# Altium PCB Zotino-DIOT.PCBDOC (part 11 of 11)
Units mil, origin at the board's own origin, x right, y up, seen from the top; angles counter-clockwise.
Board outline 8771.61 x 3949.04 mil, 4 copper layers (TopLayer, Internal Plane 2, Signal Layer 1, BottomLayer), stack 61.54 mil thick; 915 components, 534 nets, 3073 pads, 1180 vias.
Unrouted connection lines stored in the file: 36.
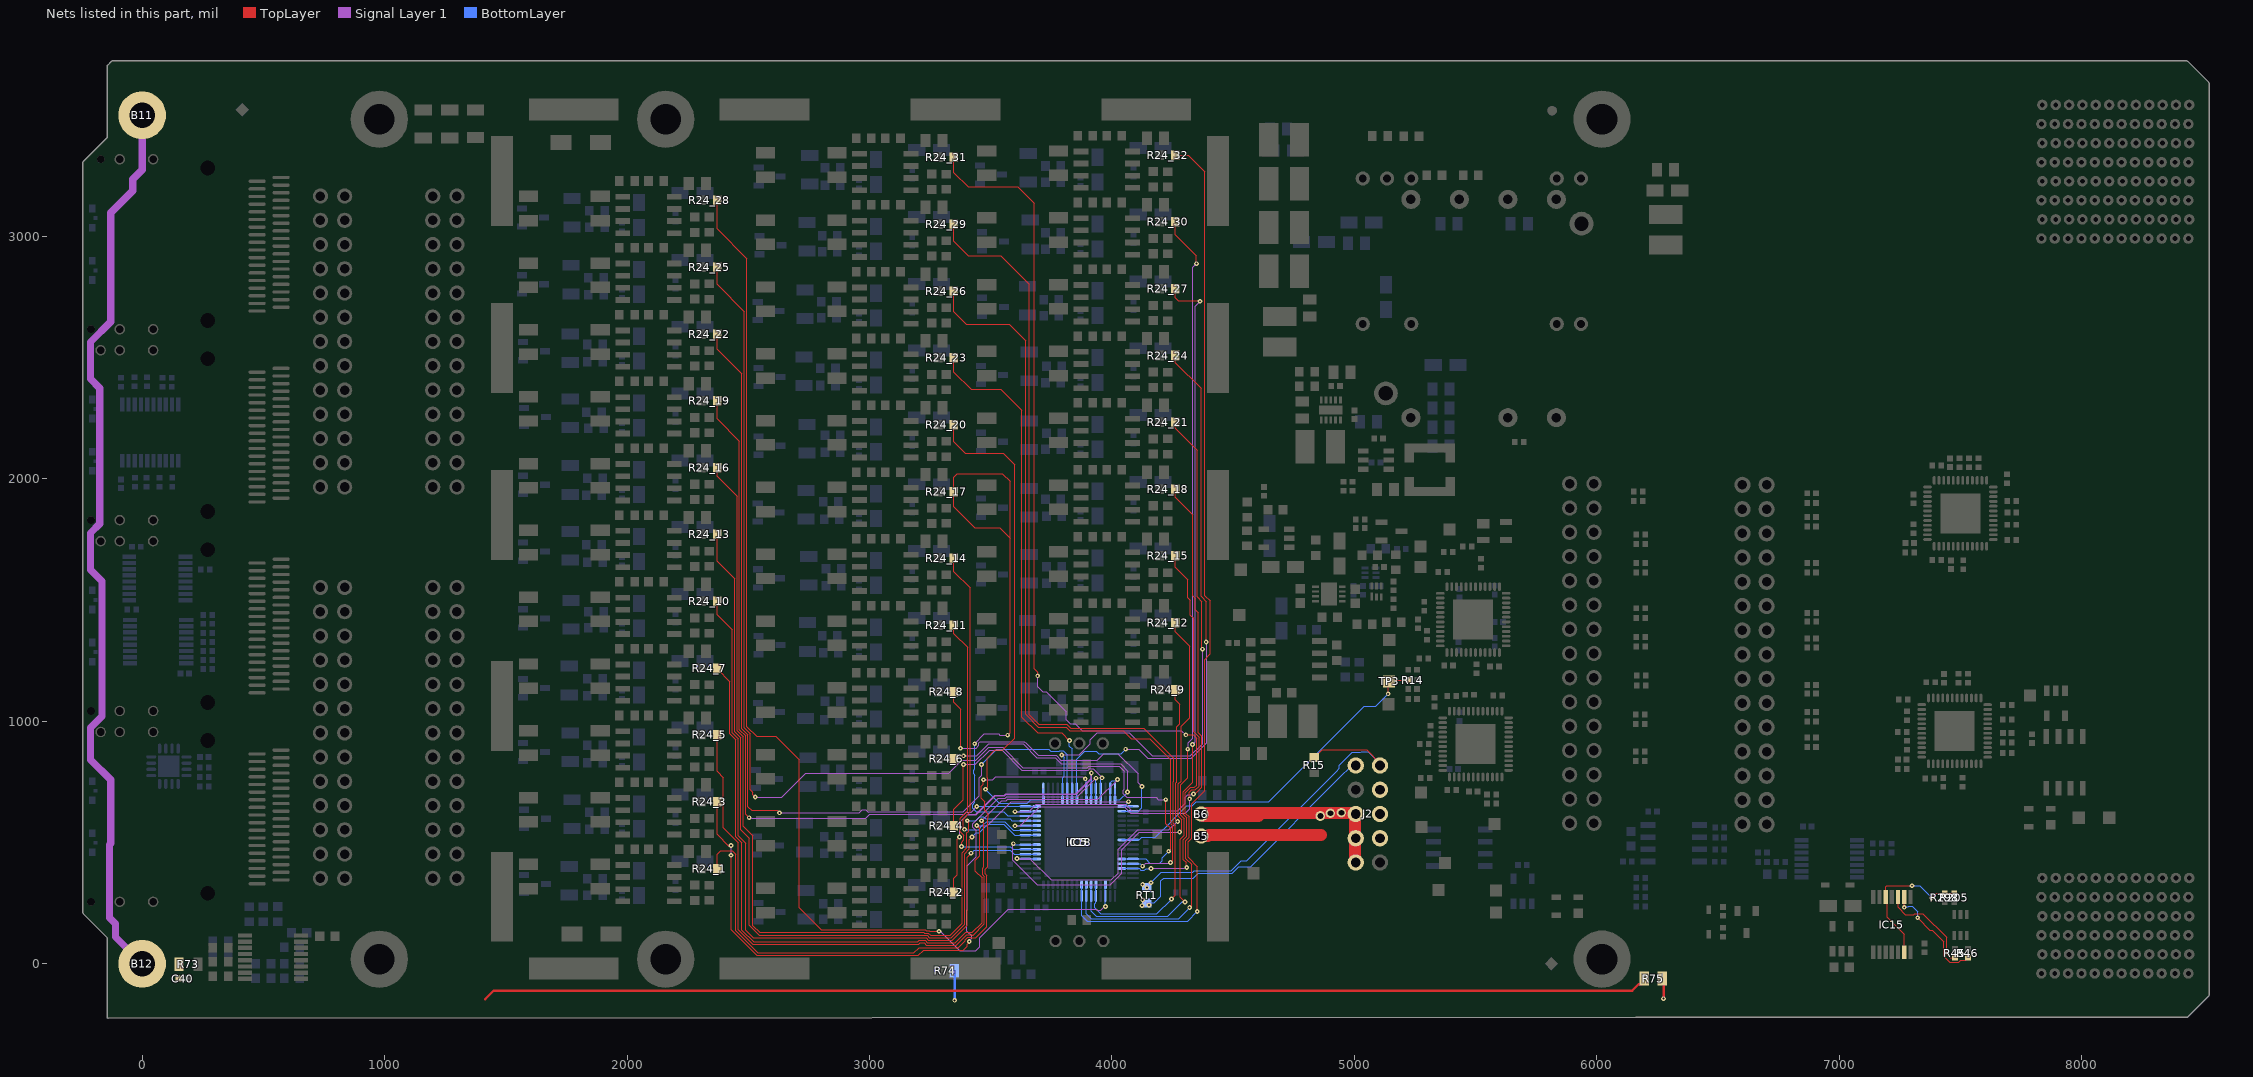
[diagram p12: the nets of this part, all layers, seen from the top]

## Via types
v1: diameter 19.68, hole 7.87, TopLayer to BottomLayer, tented both sides, 1050 vias
v2: diameter 23.62, hole 11.81, TopLayer to BottomLayer, tented both sides, 56 vias
v3: diameter 23.62, hole 11.81, TopLayer to BottomLayer, 28 vias
v4: diameter 39.37, hole 23.62, TopLayer to BottomLayer, tented both sides, 28 vias
v5: diameter 39.37, hole 19.68, TopLayer to BottomLayer, tented both sides, 7 vias
v6: diameter 19.68, hole 7.87, TopLayer to BottomLayer, tented bottom, 7 vias
v7: diameter 19.68, hole 7.87, TopLayer to BottomLayer, 4 vias

## Nets (pads, with @x,y where several pads share a name; then routed paths per layer and width w, separated by ;. In a path a pad name is that pad's centre, name@x,y a point inside that pad or via, vN(x,y) a via of type N, cw(c..) or ccw(c..) an arc to the next point about the centre after c; other vN are vias at no path point) (continued)
SDO: IC5.56 IC18.56 R14.1 TP3.1 | length 1483.5
  TopLayer w5: v1(5139.53,1113.71) 5139.53,1160.95 TP3.1@5143.46,1164.89 5148.46,1169.89 R14.1@5222.64,1169.89
  BottomLayer w5: 4113.65,511.35 4123.51,521.21 4179.67,521.21 4247.14,588.68 4247.14,590.03 4309.4,652.3 4332.37,652.3 4347.92,667.84 4646.42,667.84 5041.1,1062.53 5088.35,1062.53 v1(5139.53,1113.71)
  BottomLayer w6: IC18.56@4040.41,511.35 IC5.56@4086.67,511.35 4113.65,511.35
SENS1_1: J2.1 RT1.1 | length 1134
  BottomLayer w5: RT1.1@4144.07,251.04 4175.68,251.04 4202.36,277.72 4202.36,341.59 4214.64,353.87 4336.38,353.87 4356.28,373.77 4496.41,373.77 4523.75,401.11 4572.6,401.11 4938.74,767.25 4989.45,817.96 J2.1@5005.79,817.96
  other v1: 4123.78,239.69 4152.63,242.29 4126.9,263.7
SENS1_2: J2.2 R15.2 RT1.2 | length 1524
  TopLayer w5: R15.2@4833.97,851.04 4835.94,851.04 4868.29,883.39 5050.36,883.39 5105.79,827.96 J2.2@5105.79,817.96
  BottomLayer w5: v1(4160.83,334.18) 4204.14,377.49 4332.44,377.49 4338.72,383.77 4492.26,383.77 4533.23,424.73 4556.13,424.73 4926.52,795.13 4927.24,795.13 4938.74,806.62 4938.74,818.43 4992.31,872 5024.03,872 5027.55,875.52 5058.23,875.52 5105.79,827.96 J2.2@5105.79,817.96
  other v1: 4144.07,314.03 4126.9,326.76
SERVMOD_3V3: IC15.5 IC15.13 R205.1 R298.2 | length 616
  TopLayer w5: IC15.13@7268.3,47.36 7268.3,121.55 7197.88,191.96 7197.88,269.35 IC15.5@7191.53,275.71 7191.53,317.51 7196.85,322.83 7299.19,322.83 v1(7300.24,321.79) ; v1(7381.89,271.65) 7400.43,290.19 R205.1@7474.53,290.19
  BottomLayer w5: v1(7300.24,321.79) 7331.75,321.79 v1(7381.89,271.65)
STRIP1: B11.1 B12.1 C40.1 R73.1 R75.2 | length 8572.4
  TopLayer w10: 1415.35,-145.67 1449.8,-111.22 6145.67,-111.22 6172.32,-84.57 6181.18,-84.57 6195.87,-69.88 R75.2@6195.87,-61.02
  Signal Layer 1 w30: B12.1@0,0 -110.24,110.24 -110.24,165.35 -134.41,189.53 -134.41,491.57 -129.92,496.06 -129.92,758.74 -213.15,841.97 -213.15,973.48 -165.35,1021.28 -165.35,1577.64 -213.15,1625.43 -213.15,1777.4 -174.88,1815.67 -174.88,2374.57 -213.15,2412.83 -213.15,2564.81 -129.92,2648.04 -129.92,3098.43 -39.37,3188.98 -39.37,3236.22 0,3275.59 B11.1@0,3500
STRIP2: R74.1 | length 123.8
  TopLayer w10: v1@3350.39,-151.57 v1(3351.38,-150.59)
  BottomLayer w5: R74.1@3350.39,-28.54 R74.1@3351.38,-29.53
  BottomLayer w10: v1(3351.38,-150.59) 3351.38,-143.7 3351.38,-103.84 R74.1@3351.38,-29.53
STRIP3: R75.1 | length 82.7
  TopLayer w10: v1(6275.59,-143.7) R75.1@6275.59,-61.02
Switch_I2C.SCL: IC15.2 R46.2 | length 460.2
  TopLayer w5: v1(7268.3,232.86) IC15.2@7268.3,275.71 ; v1(7323.82,189.96) 7374.44,139.34 7383.29,139.34 7431.1,91.54 7431.1,30.51 7455.44,6.18 7492.73,6.18 7502.06,15.51 7521.55,15.51 R46.2@7530.47,24.42
  BottomLayer w5: v1(7268.3,232.86) 7271.11,235.67 7285.14,235.67 7286.7,237.23 7301.07,237.23 7323.82,214.49 v1(7323.82,189.96)
Switch_I2C.SDA: IC15.3 R45.2 | length 408.3
  TopLayer w5: IC15.3@7242.71,275.71 7242.71,233.27 7273.43,202.55 7306.77,202.55 7311.52,207.3 7344.86,207.3 7442.91,109.25 7442.91,39.37 7457.19,25.09 R45.2@7477.42,25.09
TEC1+: B5.1 J2.4 J2.6 J2.8 | length 496.9
  TopLayer w50: B5.1@4367.87,527.09 4395.43,527.09 4399.83,531.49 4490.68,531.49 4491.14,531.03 4862.75,531.03
TEC1-: B6.1 J2.5 J2.7 J2.9 | length 1067.7
  TopLayer w50: B6.1@4367.87,617.65 4375.75,609.77 4604.09,609.77 ; B6.1@4376.14,621.98 4997.2,621.98 5001.21,617.96 J2.5@5005.79,617.96 ; J2.5@4999.09,612.06 5002.55,608.6 5002.55,421.2 J2.9@5005.79,417.96
  other v4: 4860,609.77 4901.34,621.58 4946.61,622.57
VOUT1: IC5.42 IC18.42 R24_1.1 | length 2734.6
  TopLayer w5: R24_1.1@2371.5,393 2371.5,452.09 2386.21,466.8 2434.93,466.8 2448.84,452.89 2448.84,135.46 2538.65,45.66 3183.32,45.66 3204.5,66.83 3365.21,66.83 3394.23,95.85 3394.23,99.25 3404.39,109.41 3418.75,109.41 3420.3,107.86 3438.74,107.86 3484.23,153.35 3484.23,363.78 3476.69,371.32 3476.69,390.2 3487.85,401.36 3487.85,599.83 3490.61,602.59 3490.61,616.95 3475.01,632.55 3475.01,667.99 3460.77,682.23 3460.77,731.82 3470.23,741.28 v1(3470.23,759.38)
  Signal Layer 1 w5: v1(3470.23,759.38) 3508.01,759.38 3520.91,772.28 3880.74,772.28 v1(3889.99,763.03)
  BottomLayer w5: v1(3889.99,763.03) 3894.74,758.28 IC5.42@3894.74,722.96 IC18.42@3894.74,676.7
VOUT2: IC5.43 IC18.43 R24_2.1 | length 1051
  TopLayer w5: R24_2.1@3347.87,294.58 3347.87,353.66 3362.59,368.38 3362.59,476.35 3362.34,476.6 3362.34,513.68 v1(3371.81,523.16)
  Signal Layer 1 w5: v1(3371.81,523.16) 3371.81,583.12 3403.71,615.02 3404.61,615.02
  Signal Layer 1 w6: 3404.61,615.02 3439.14,615.02 3517.04,692.91 3556.33,692.91 3562.75,699.33 3851.52,699.33 3915.12,762.93 v1(3915.12,786.94)
  BottomLayer w6: IC18.43@3914.43,676.7 IC5.43@3914.43,722.96 3914.43,786.24 v1(3915.12,786.94)
VOUT3: IC5.44 IC18.44 R24_3.1 | length 2809.6
  TopLayer w5: R24_3.1@2371.5,668.59 2371.5,534.5 2418.11,487.89 v1(2428.84,487.89) ; v1(2428.84,447.89) 2428.84,141.32 2534.5,35.66 3202,35.66 3223.05,56.71 3387.45,56.71 3403.16,72.42 3403.16,79.69 3411.57,88.1 v1(3411.57,92.07)
  Signal Layer 1 w5: v1(2428.84,447.89) v1(2428.84,487.89) ; v1(3411.57,92.07) 3411.57,96.04 3421.26,105.73 3421.26,115.13 3401.56,134.83 3401.56,222.61 3402.62,223.67 3402.62,404.42 3440.33,442.13 3440.33,548.21 3425.33,563.22 3425.33,577.58 3530.16,682.41 3560.68,682.41 3567.1,688.83 3857.12,688.83 v1(3934.11,765.81)
  BottomLayer w5: IC18.44@3934.11,676.7 IC5.44@3934.11,722.96 v1(3934.11,765.81)
VOUT4: IC5.45 IC18.45 R24_4.1 | length 1009.4
  TopLayer w5: R24_4.1@3347.87,570.17 3347.87,637.01 3387.55,676.69 v1(3387.55,822.37)
  Signal Layer 1 w5: v1(3387.55,822.37) 3437.13,822.37 3496.18,881.42 3546.65,881.42 3629.11,798.96 3902.62,798.96 3907.93,804.28 3922.32,804.28 v1(3959.35,767.25)
  BottomLayer w5: IC18.45@3953.8,676.7 IC5.45@3953.8,722.96 3953.8,761.7 v1(3959.35,767.25)
VOUT5: IC5.47 IC18.47 R24_5.1 | length 3096.7
  TopLayer w5: R24_5.1@2371.5,944.18 2371.5,793.5 2396.71,768.29 2396.71,561.73 2458.84,499.61 2458.84,139.61 2517.9,80.55 3204.07,80.55 3209.98,86.46 3225.53,86.46 3235.16,76.83 3358.56,76.83 3384.23,102.5 3384.23,103.4 3400.24,119.41 3422.9,119.41 3423.72,118.58 3427.87,118.58 3474.23,164.95 3474.23,359.64 3466.69,367.18 3466.69,394.34 3471.82,399.47 3471.82,580.62 v1(3462.35,590.09)
  Signal Layer 1 w5: v1(3462.35,590.09) 3544.68,672.41 3564.83,672.41 3571.24,678.83 3942.08,678.83 v1(4023.4,760.15)
  BottomLayer w5: IC18.47@3993.17,676.7 IC5.47@3993.17,722.96 3993.17,747.2 4001.04,755.07 4018.32,755.07 v1(4023.4,760.15)
VOUT6: IC5.48 IC18.48 R24_6.1 | length 986.5
  TopLayer w5: R24_6.1@3347.87,845.76 3359.92,857.8 v1(3387.55,857.8)
  Signal Layer 1 w5: v1(3387.55,857.8) 3442.11,857.8 3491.17,906.86 3634.48,906.86 3690.58,850.76 3765.37,850.76 3791.85,824.28 4035.56,824.28 4064.72,795.11 v1(4064.72,708.2)
  BottomLayer w5: IC5.48@4012.85,722.96 IC18.48@4012.85,676.7 4033.23,676.7 v1(4064.72,708.2)
VOUT7: IC5.49 IC18.49 R24_7.1 | length 3341
  TopLayer w5: R24_7.1@2371.5,1219.77 2371.5,1216.5 2423.84,1164.16 2423.84,949.64 2448.84,924.64 2448.84,523.75 2473.84,498.75 2473.84,138.75 2522.04,90.55 3199.92,90.55 3205.84,96.46 3229.67,96.46 3239.3,86.83 3354.42,86.83 3374.23,106.64 3374.23,107.54 3396.1,129.41 3424.55,129.41 3464.23,169.09 3464.23,355.49 3437.14,382.59 3437.14,427.98 3455.33,446.17 3455.33,557.74 v1(3442.67,570.4)
  Signal Layer 1 w5: v1(3442.67,570.4) 3486.28,570.4 3584.71,668.83 v1(4068.66,668.83)
  BottomLayer w5: IC18.49@4040.41,649.14 IC18.49@4048.98,649.14 ; v1(4068.66,668.83) IC18.49@4048.98,649.14 ; IC5.49@4086.67,649.14 IC18.49@4048.98,649.14
VOUT8: IC5.50 IC18.50 R24_8.1 | length 1305.6
  TopLayer w5: R24_8.1@3347.87,1121.35 3347.87,1078.59 3375.75,1050.72 v1(3375.75,889.3)
  Signal Layer 1 w5: v1(3375.75,889.3) 3439.78,889.3 3451.18,900.71 3451.18,911.09 3456.95,916.86 3638.62,916.86 3646.18,909.3 3647.09,909.3 3695.62,860.76 3769.51,860.76 3789.86,840.41 3940.13,840.41 3966.99,867.27 4023.76,867.27 4108.03,783 4108.03,747.57 v1(4123.78,731.82)
  BottomLayer w5: IC18.50@4040.41,629.46 4108.64,629.46 4123.78,644.6 v1(4123.78,731.82)
VOUT9: IC5.21 IC18.21 R24_9.1 | length 1501.1
  TopLayer w5: R24_9.1@4261.26,1131.19 4261.26,1088.91 4279.76,1070.4 4279.76,990.17 4266.73,977.13 4266.73,749.51 4263.29,746.07 4263.29,594.94 v1(4271.26,586.97)
  Signal Layer 1 w5: v1(3608.45,434.22) 3660.63,434.22 3748.86,345.99 3997.8,345.99 4025.35,373.55 4025.35,471.98 4106.88,553.5 4235.14,553.5 4268.6,586.97 v1(4271.26,586.97)
  BottomLayer w5: v1(3608.45,434.22) 3688.41,434.22 IC18.21@3690.02,432.61
VOUT10: IC5.22 IC18.22 R24_10.1 | length 2950
  TopLayer w5: R24_10.1@2371.5,1495.36 2371.5,1440.8 2433.84,1378.45 2433.84,953.79 2458.84,928.79 2458.84,527.89 2488.84,497.89 2488.84,137.89 2519.85,106.88 3233.4,106.88 3243.44,96.83 3340.57,96.83 3402.62,158.88 3402.62,439.8 v1(3419.05,456.23)
  BottomLayer w5: v1@3419.05,456.23 3431.98,469.16 3581.09,469.16 3597.96,452.29 IC5.22@3643.76,452.29 IC18.22@3690.02,452.29
VOUT11: IC5.23 IC18.23 R24_11.1 | length 1276.2
  TopLayer w5: R24_11.1@3347.87,1396.94 3347.87,1362.06 3404.9,1305.03 3404.9,842.75 3403.31,841.15 3403.31,839.02 3404.89,837.43 3404.89,630.35 3374.15,599.61 3374.15,545.34 3389.15,530.34 3389.15,511.35 3379.68,501.87 v1(3379.68,483.79)
  BottomLayer w5: v1(3379.68,483.79) 3580.59,483.81 3592.42,471.98 IC5.23@3643.76,471.98 IC18.23@3690.02,471.98
VOUT12: IC5.24 IC18.24 R24_12.1 | length 1962.8
  TopLayer w5: R24_12.1@4261.26,1406.78 4261.26,1369.93 4320.63,1310.56 4320.63,1015.28 4285.2,979.85 4285.2,753.84 4273.29,741.93 4273.29,609.47 4288.6,594.15 4288.6,552.47 v1(4279.64,543.5)
  Signal Layer 1 w5: v1(3593.32,495.6) 3591.1,493.38 3591.1,427.03 3691.83,326.31 3993.17,326.31 4040.41,373.55 4040.41,471.28 4112.63,543.5 v1(4279.64,543.5)
  BottomLayer w5: v1(3593.32,495.6) 3597.26,491.66 IC5.24@3643.76,491.66 IC18.24@3690.02,491.66
VOUT13: IC5.26 IC18.26 R24_13.1 | length 3281
  TopLayer w5: R24_13.1@2371.5,1770.95 2371.5,1661.27 2443.84,1588.92 2443.84,957.93 2468.84,932.93 2468.84,552.89 2503.84,517.89 2503.84,158.75 2545.71,116.88 3237.54,116.88 3247.59,106.83 3336.43,106.83 3392.62,163.03 3392.62,454.32 3411.86,473.57 3411.86,512.03 v1(3422.99,523.16)
  BottomLayer w5: v1(3422.99,523.16) 3440.95,541.12 3452.05,541.12 3487.11,576.17 3554.38,576.17 3599.51,531.03 IC5.26@3643.76,531.03 IC18.26@3690.02,531.03
VOUT14: IC5.27 IC18.27 R24_14.1 | length 1488.6
  TopLayer w5: R24_14.1@3347.87,1672.53 3347.87,1617.96 3414.9,1550.93 3414.9,626.21 3385.96,597.27 3385.96,560.19 v1(3391.5,554.65)
  BottomLayer w5: v1(3391.5,554.65) 3393.09,553.06 3449.85,553.06 3460.01,563.22 3460.01,565.15 3467.61,572.74 3469.54,572.74 3482.97,586.17 3558.52,586.17 3593.97,550.72 IC5.27@3643.76,550.72 IC18.27@3690.02,550.72
VOUT15: IC5.28 IC18.28 R24_15.1 | length 1973.3
  TopLayer w5: R24_15.1@4261.26,1682.37 4261.26,1636.39 4312.76,1584.89 4312.76,1510.62 4323.84,1499.54 4323.84,1438.57 4337.68,1424.73 4337.68,956.84 4359.78,934.74 4359.78,733.21 4344.24,717.66 4329.19,717.66 4319.03,707.5 4319.03,682.24 v1(4320.63,680.64)
  Signal Layer 1 w5: v1(3600.16,569.06) 3622.58,569.06 3702.35,648.83 4049.99,648.83 4077.55,621.27 4302.96,621.27 4320.63,638.94 v1(4320.63,680.64)
  BottomLayer w5: v1(3600.16,569.06) 3601.5,570.4 IC5.28@3643.76,570.4 IC18.28@3690.02,570.4
VOUT16: IC5.29 IC18.29 R24_16.1 | length 3588.5
  TopLayer w5: R24_16.1@2371.5,2046.54 2371.5,2011.66 2453.84,1929.32 2453.84,962.07 2478.84,937.07 2478.84,567.89 2518.84,527.89 2518.84,157.89 2547.05,129.68 3223.25,129.68 3226.06,126.88 3241.68,126.88 3251.73,116.83 3332.28,116.83 3382.62,167.17 3382.62,458.47 3401.86,477.71 3401.86,540.5 3408.84,547.47 3408.84,584.55 v1(3403.3,590.09)
  BottomLayer w5: v1(3403.3,590.09) 3437.83,590.09 3455.17,607.43 3469.54,607.43 3479.43,597.54 3579.8,597.54 3587.25,590.09 IC5.29@3643.76,590.09 IC18.29@3690.02,590.09
VOUT17: IC5.30 IC18.30 R24_17.1 | length 2417.4
  TopLayer w5: v1(3570,943) 3579.76,952.76 3579.76,1755.44 ; 3579.76,1755.44 3536.46,1798.75 3434.8,1798.75 3347.87,1885.68 R24_17.1@3347.87,1948.12 3347.87,2007.21 3362.59,2021.92 3547.87,2021.92 3579.76,1990.03 3579.76,1755.44
  Signal Layer 1 w5: v1(3433.84,907.89) 3474,948.05 3533,948.05 3538.05,943 v1(3570,943)
  BottomLayer w5: v1(3433.84,907.89) 3434.8,906.93 3434.8,803.59 3429.27,798.06 3429.27,783.69 3434.8,778.16 3434.8,665.8 3425.33,656.32 3425.33,641.96 3440.17,627.11 3552.94,627.11 3570.28,609.77 IC5.30@3643.76,609.77 IC18.30@3690.02,609.77
VOUT18: IC5.31 IC18.31 R24_18.1 | length 2217.1
  TopLayer w5: R24_18.1@4261.26,1957.96 4261.26,1925.05 4333.84,1852.47 4333.84,1517.82 4343.84,1507.82 4343.84,1460.58 4356.5,1447.92 4356.5,952.17 4369.78,938.88 4369.78,729.07 4341.04,700.32 v1(4336.37,700.32)
  Signal Layer 1 w5: v1(3600.16,627.49) 3657.24,627.49 3688.58,658.83 4054.14,658.83 4061.48,651.48 4062.38,651.48 4082.6,631.27 4271.26,631.27 4303.29,663.3 4303.29,687.82 4313.45,697.98 4327.81,697.98 4329.42,696.38 4336.37,696.38 v1(4336.37,700.32)
  BottomLayer w5: v1(3600.16,627.49) 3688.05,627.49 IC18.31@3690.02,629.46
VOUT19: IC5.32 IC18.32 R24_19.1 | length 2981.3
  TopLayer w5: R24_19.1@2371.5,2322.13 2371.5,2247.88 2463.84,2155.54 2463.84,966.21 2488.84,941.21 2488.84,617.89 v1(2503.84,602.89)
  Signal Layer 1 w5: v1(2503.84,602.89) 2506.1,600.63 2984.77,600.63 3001.15,617 3391.55,617 3400.07,625.52 3419.05,625.52 v1(3442.67,649.14)
  BottomLayer w5: v1(3442.67,649.14) IC5.32@3643.76,649.14 IC18.32@3690.02,649.14
VOUT20: IC5.33 IC18.33 R24_20.1 | length 2083.8
  TopLayer w5: R24_20.1@3347.87,2223.71 3347.87,2153.4 3395.43,2105.83 3551.6,2105.83 3598.84,2058.59 3598.84,931.29 3549.67,882.11 3519.67,882.11 3486.04,848.49 3486.04,768.09 3487.57,766.56 3487.57,729.47 v1(3478.11,720.01)
  BottomLayer w5: v1(3478.11,720.01) 3536.11,662 3650.3,662 3665,676.7 IC18.33@3717.57,676.7 IC5.33@3717.57,722.96
VOUT21: IC5.37 IC18.37 R24_21.1 | length 2251.7
  TopLayer w5: R24_21.1@4261.26,2233.55 4261.26,2208.51 4352.13,2117.65 4352.13,1513.68 4371.5,1494.31 4371.5,1300.23 v1(4373.84,1297.89)
  Signal Layer 1 w5: v1(3793.06,861.74) 3864.94,861.74 3911.18,907.98 3911.18,924.73 3938.74,952.29 4071.15,952.29 4165.42,858.02 4324.08,858.02 4373.84,907.78 v1(4373.84,1297.89)
  BottomLayer w5: v1(3793.06,861.74) 3802.58,852.22 3802.58,773.72 3796.32,767.46 IC5.37@3796.32,722.96 IC18.37@3796.32,676.7
VOUT22: IC5.38 IC18.38 R24_22.1 | length 3716.5
  TopLayer w5: R24_22.1@2371.5,2597.72 2371.5,2535.28 2473.84,2432.94 2473.84,970.35 2498.84,945.35 2498.84,647.89 2513.84,632.89 2618.84,632.89 v1(2628.84,622.89)
  Signal Layer 1 w5: v1(2628.84,622.89) 2957.98,622.89 2970.41,635.31 2984.77,635.31 2995.04,625.04 2997,627 3387.4,627 3452.89,692.48 3452.89,766.56 3463.96,777.63 3463.96,820.78 v1(3462.36,822.37)
  BottomLayer w5: v1(3462.36,822.37) 3524.04,884.05 3738.85,884.05 3747.01,875.89 3782.69,875.89 3785.88,879.08 3800.25,879.08 3816,863.33 IC5.38@3816,722.96 IC18.38@3816,676.7
VOUT23: IC5.39 IC18.39 R24_23.1 | length 2153.5
  TopLayer w5: R24_23.1@3347.87,2499.3 3347.87,2440.8 3419.06,2369.61 3541.1,2369.61 3627.72,2283 ; 3628.84,2283 3628.84,1017.89 3694.44,952.29 3793.07,952.29 v1(3824.57,920.8)
  BottomLayer w5: v1(3824.57,920.8) 3824.57,897.17 3835.69,886.06 IC5.39@3835.69,722.96 IC18.39@3835.69,676.7
VOUT24: IC5.40 IC18.40 R24_24.1 | length 2420.4
  TopLayer w5: R24_24.1@4261.26,2509.14 4261.26,2480.17 4367.87,2373.55 4367.87,1515.28 4388.84,1494.32 v1(4388.84,1327.89)
  Signal Layer 1 w5: v1(4056.85,885.36) 4109.99,885.36 4147.34,848.02 4328.22,848.02 4391.18,910.98 4391.18,1325.55 v1(4388.84,1327.89)
  BottomLayer w5: IC18.40@3855.37,676.7 IC5.40@3855.37,722.96 3855.37,843.16 3888.11,875.89 3936.24,875.89 3944.86,867.27 4038.76,867.27 v1(4056.85,885.36)
VOUT25: IC5.60 IC18.60 R24_25.1 | length 4635.3
  TopLayer w5: R24_25.1@2371.49,2873.32 2371.49,2803 2483.84,2690.66 2483.84,974.5 2508.84,949.5 2508.84,717.89 2518.84,707.89 2518.84,697.89 v1(2528.84,687.89) ; v1(4222.28,676.98) 4222.28,578.51 4241.81,558.98 4241.81,471.9 v1(4234.02,464.1)
  Signal Layer 1 w5: v1(2528.84,687.89) 2638.91,687.89 2737.95,786.94 3327.6,786.94 3380.37,839.71 3438.17,839.71 3491.69,893.24 3548.98,893.24 3633.25,808.96 3898.48,808.96 3903.79,814.28 4030.37,814.28 4051.26,793.39 4051.26,719.26 4047.38,715.38 4047.38,701.01 4062.23,686.17 4182.84,686.17 4192.02,676.98 v1(4222.28,676.98)
  BottomLayer w5: IC18.60@4040.41,432.61 IC5.60@4086.67,432.61 4139.31,432.61 4156.65,415.26 4197.88,415.26 4208.04,425.42 4208.04,438.13 v1(4234.02,464.1)
VOUT26: IC5.61 IC18.61 R24_26.1 | length 3291.6
  TopLayer w5: R24_26.1@3347.87,2774.89 3347.87,2688.83 3399.37,2637.33 3575.65,2637.33 3643.84,2569.14 3643.84,1028.75 3696.43,976.15 3811.91,976.15 3825.77,962.29 4046.85,962.29 4080.47,928.67 4155.28,928.67 4242.1,841.85 4242.1,587.82 4243.92,586 4243.92,575.64 4251.81,567.75 4251.81,427.69 v1(4241.89,417.76)
  Signal Layer 1 w5: v1(4126.9,402.76) 4139.4,415.26 4239.84,415.26 v1@4241.89,417.31
  BottomLayer w5: IC18.61@4040.41,412.92 IC5.61@4086.67,412.92 4116.74,412.92 v1(4126.9,402.76)
VOUT27: IC5.62 IC18.62 R24_27.1 | length 2808.3
  TopLayer w5: R24_27.1@4261.26,2784.73 4261.26,2747.88 4273.39,2735.76 4360.97,2735.76 v1(4363.84,2732.89) ; v1(4308.82,397.17) 4306.78,399.21 4306.78,418.17 4294.72,430.23 4294.72,512.66 4308.6,526.54 4308.6,602.44 4293.29,617.75 4293.29,710.05 4332.44,749.2 v1(4332.44,905.05)
  Signal Layer 1 w5: v1(4160.83,393.24) 4304.88,393.24 v1(4308.82,397.17) ; v1(4332.44,905.05) 4343.84,916.45 4343.84,2712.89 v1(4363.84,2732.89)
  BottomLayer w5: IC18.62@4040.41,393.24 4044.35,389.3 4048.29,393.24 IC5.62@4086.67,393.24 4111.9,393.24 4119.72,385.42 4134.08,385.42 4141.73,393.07 4160.67,393.07 v1(4160.83,393.24)
VOUT28: IC5.3 IC18.3 R24_28.1 | length 4631.3
  TopLayer w5: R24_28.1@2371.49,3148.91 2371.49,3031.35 2493.84,2909 2493.84,978.64 2534.59,937.89 2614.11,937.89 2711,841 2711,231.21 2801.95,140.26 3230.2,140.26 3233.59,136.88 3245.83,136.88 3248.53,134.18 v1(3286.89,134.18)
  Signal Layer 1 w5: v1(3286.89,134.18) 3292.29,134.18 3371.81,54.65 3438.74,54.65 3454.49,70.4 3454.49,106.74 3573.29,225.54 3934.52,225.54 3939.79,220.27 3954.16,220.27 3970.33,236.44 v1(3973.48,236.44)
  BottomLayer w5: v1(3973.48,236.44) IC5.3@3973.48,280.05 IC18.3@3973.48,326.31
VOUT29: IC5.5 IC18.5 R24_29.1 | length 3942.2
  TopLayer w5: R24_29.1@3347.87,3050.48 3347.87,2980.17 3407.24,2920.8 3541.1,2920.8 3658.84,2803.06 3658.84,1027.89 3698.84,987.89 3814.31,987.89 3829.91,972.29 4131.34,972.29 4255.83,847.8 4255.83,752.75 4253.29,750.21 4253.29,590.77 4253.92,590.14 4253.92,579.79 4261.81,571.89 4261.81,283.25 v1(4245.82,267.25)
  BottomLayer w5: IC18.5@3934.11,326.31 IC5.5@3934.11,280.05 3934.11,252.05 3929.63,247.57 3929.63,230.43 3953.68,206.38 4184.95,206.38 v1(4245.82,267.25)
VOUT30: IC5.6 IC18.6 R24_30.1 | length 3422.6
  TopLayer w5: R24_30.1@4261.26,3060.32 4261.26,3007.72 4348.84,2920.14 v1(4348.84,2887.89) ; v1(4300.94,255.44) 4281.26,275.13 4281.26,513.34 4298.6,530.68 4298.6,598.3 4283.29,613.61 4283.29,737.78 4312.75,767.24 v1(4312.75,885.36)
  Signal Layer 1 w5: v1(4312.75,885.36) 4315.1,887.71 4315.1,912.23 4333.84,930.97 4333.84,2872.89 v1(4348.84,2887.89)
  BottomLayer w5: IC18.6@3914.43,326.31 IC5.6@3914.43,280.05 3914.43,217.28 3935.32,196.38 4230.07,196.38 4289.13,255.44 v1(4300.94,255.44) ; v1(4312.75,885.36) v1@4312.75,889.29
VOUT31: IC5.7 IC18.7 R24_31.1 | length 4534.1
  TopLayer w5: R24_31.1@3347.87,3326.07 3347.87,3263.63 3407.24,3204.26 3611.97,3204.26 3678.84,3137.39 3678.84,1217.89 3693.84,1202.89 v1(3693.84,1187.89) ; v1(4304.88,944.42) 4335.97,944.42 4349.78,930.6 4349.78,737.35 4340.1,727.66 4325.04,727.66 4303.29,705.91 4303.29,621.9 4318.6,606.58 4318.6,522.39 4304.72,508.52 4304.72,434.37 4328.5,410.59 4328.5,239.69 v1(4320.63,231.82)
  Signal Layer 1 w5: v1(3693.84,1187.89) 3693.84,1143.1 3714.29,1122.65 3729.08,1122.65 3811.5,1040.23 3811.5,1006.96 3827.75,990.71 3849.21,990.71 3877.63,962.29 4287.01,962.29 v1(4304.88,944.42)
  BottomLayer w5: IC18.7@3894.74,326.31 IC5.7@3894.74,280.05 3894.74,207.27 3915.63,186.38 4275.19,186.38 v1(4320.63,231.82)
VOUT32: IC5.8 IC18.8 R24_32.1 | length 3894.9
  TopLayer w5: R24_32.1@4261.26,3335.91 4314.96,3335.91 4383.62,3267.25 4383.62,1519.22 4406.18,1496.66 4406.18,1278 4382.03,1253.85 4382.03,714.48 4328.6,661.05 4328.6,518.25 4314.72,504.37 4314.72,438.51 4352.13,401.11 v1(4352.13,216.07)
  BottomLayer w5: IC18.8@3875.06,326.31 IC5.8@3875.06,280.05 3875.06,198.98 3897.65,176.38 4312.43,176.38 v1(4352.13,216.07)
pads on no net: B2.1 B3.1 B4.1 B8.1 B9.1 B10.1 D5.5 FTG1.FTG2 FTG2.FTG2 FTG3.1 FTG4.1 FTG5.1 FTG6.1 IC1.9 IC2_1.1 IC2_1.5 IC2_1.8 IC2_2.1 IC2_2.5 IC2_2.8 IC2_3.1 IC2_3.5 IC2_3.8 IC2_4.1 IC2_4.5 IC2_4.8 IC2_5.1 IC2_5.5 IC2_5.8 IC2_6.1 IC2_6.5 IC2_6.8 IC2_7.1 IC2_7.5 IC2_7.8 IC2_8.1 IC2_8.5 IC2_8.8 IC2_9.1 IC2_9.5 IC2_9.8 IC2_10.1 IC2_10.5 IC2_10.8 IC2_11.1 IC2_11.5 IC2_11.8 IC2_12.1 IC2_12.5 IC2_12.8 IC2_13.1 IC2_13.5 IC2_13.8 IC2_14.1 IC2_14.5 IC2_14.8 IC2_15.1 IC2_15.5 IC2_15.8 IC2_16.1 IC2_16.5 IC2_16.8 IC2_17.1 IC2_17.5 IC2_17.8 IC2_18.1 IC2_18.5 IC2_18.8 IC2_19.1 IC2_19.5 IC2_19.8 IC2_20.1 IC2_20.5 IC2_20.8 IC2_21.1 IC2_21.5 IC2_21.8 IC2_22.1 IC2_22.5 IC2_22.8 IC2_23.1 IC2_23.5 IC2_23.8 IC2_24.1 IC2_24.5 IC2_24.8 IC2_25.1 IC2_25.5 IC2_25.8 IC2_26.1 IC2_26.5 IC2_26.8 IC2_27.1 IC2_27.5 IC2_27.8 IC2_28.1 IC2_28.5 IC2_28.8 IC2_29.1 IC2_29.5 IC2_29.8 IC2_30.1 IC2_30.5 IC2_30.8 IC2_31.1 IC2_31.5 IC2_31.8 IC2_32.1 IC2_32.5 IC2_32.8 IC3.1 IC3.5 IC3.7 IC3.8 IC8.17 IC8.25 IC8.29 IC8.32 IC8.35 IC8.44 IC9.17 IC9.25 IC9.29 IC9.32 IC9.35 IC9.44 IC10.1 IC10.2 IC10.3 IC10.7 IC14.3 IC22.17 IC22.25 IC22.29 IC22.32 IC22.35 IC22.44 IC23.9 IC25.17 IC25.25 IC25.28 IC25.32 IC25.35 IC25.44 IC26.1 IC26.2 IC26.3 IC26.7 IC28.4 IC29.5 IC30.11 IC30.17 IC32.5 IC35.4 IC35.7 J1.MTG1 J1.MTG2 J1.SHELL6 J8.A5 J8.B1 J8.B5 J8.D5 J8.E4 J8.E5 J8.F4 J8.G3 J8.H3 J8.I2 J8.J3 J8.K3 J8.L2 J9.A3 J9.A5 J9.A7 J9.A8 J9.B2 J9.B3 J9.B4 J9.B5 J9.B6 J9.B7 J9.B8 J9.C2 J9.C4 J9.C6 J9.C8 J9.D3 J9.D5 J9.D7 J9.D8 J9.E2 J9.E3 J9.E4 J9.E5 J9.E6 J9.E7 J9.E8 J9.F2 J9.F4 J9.F6 J9.F8 J9.G3 J9.G5 J9.G7 J9.H2 J9.H3 J9.H4 J9.H5 J9.H6 J9.H7 J9.H8 J9.I2 J9.I4 J9.I6 J9.I8 J9.J3 J9.J5 J9.J7 J9.K2 J9.K3 J9.K4 J9.K5 J9.K6 J9.K7 J9.K8 J9.L2 J9.L4 J9.L6 J9.L8 J13.MTG1 J13.MTG2 J13.SHELL6 J14.MTG1 J14.MTG2 J14.SHELL3 J14.SHELL6 J15.MTG1 J15.MTG2 J15.SHELL6 LD1.3 LD2.3 LD3.3 LD4.3 LD5.3 LD6.3 LD7.3 LD8.3

## Polygon pours and split planes (outlines as drawn)
no net on BottomLayer "balancing" (solid, pour order 66): -101.33,3602.08 8524.96,3602.08 8524.96,-97.94 -101.33,-97.94
P13V0_SCSI on BottomLayer "L3-No Net" (solid, remove dead copper, pour order 55): 726.14,1918.07 792.82,1918.07 842.79,1968.04 842.79,2086.15 842.79,3071.86 804.88,3109.77 763.78,3109.77 763.78,3208.2 922.99,3208.2 989.72,3208.2 1048.78,3267.25 1068.46,3286.94 1277.32,3286.94 1364.43,3286.94 1374.27,3277.09 1375.75,3275.62 1375.75,3218.2 1375.75,3129.46 1250.93,3129.46 1250.93,3199.5 1159.21,3199.5 1159.21,3198.26 1060.79,3099.84 1041.1,3080.15 1041.1,2991.66 1041.1,1731.82 1356.06,1731.82 1356.06,1519.51 1351.84,1515.28 1257.64,1515.28 1257.64,1653.08 844.25,1653.08 844.25,1515.89 841.4,1513.04 726.14,1513.04 726.14,1772.71
N13V0_SCSI on BottomLayer "L3-No Net" (solid, remove dead copper, pour order 59): 706.46,3208.2 706.46,3129.46 686.77,3109.77 667.09,3090.09 627.72,3090.09 627.72,3031.03 627.72,1948.35 608.03,1928.67 588.35,1908.98 548.98,1908.98 312.76,1908.98 312.76,1968.04 568.66,1968.04 568.66,3168.83 608.03,3208.2
P12V0 on BottomLayer "BottomLayer-P12V0" (solid, remove dead copper, pour order 36): 5233.83,-39.83 5903.31,-39.83 6001.73,58.59 6001.73,62.53 6005.67,62.53 6119.84,176.7 6159.21,216.07 6159.21,2879.29 5239.75,2879.29 5037.17,2676.7 5037.17,2538.91 5076.54,2499.54 5730,2498.72 5982.05,2195 5982.05,741.97 5812.23,572.15 5812.23,257.89 5420.7,257.89 5204.65,473.94 5078.5,473.94 5076.54,471.98 5080.48,113.52
P12V0A on BottomLayer "L3-No Net" (solid, remove dead copper, pour order 47): 4626.16,1453.37 4862.38,1453.37 4862.38,1985.94 4468.68,1985.94 4429.31,2025.31 4429.31,3482 2437.81,3482 2255.02,3299.21 2092.41,3299.21 2049.57,3342.06 1572.6,3342.06 1572.6,3228.91 2493.86,3228.91 2493.86,371.77 2545.04,371.77 2545.04,3403.26 2736.39,3403.26 3407.24,3403.26 3407.24,983.79 3483.84,983.79 3483.84,3403.26 4074.98,3403.26 4074.98,1749.72 4704.9,1749.72 4586.79,1749.72 4586.79,1789.09 4704.9,1789.09 4704.9,1651.49 4626.16,1572.75
P12V0_CPCIS on BottomLayer "NetC18_2" (solid, remove dead copper, pour order 34): 6181.1,-98.43 6190.94,-108.27 8474.41,-108.27 8494.09,-88.58 8494.09,-9.84 8474.41,9.84 7165.35,9.84 7135.83,39.37 6830.71,39.37 6437.01,433.07 6200.79,433.07 6181.1,413.39
N13V0_SCSI on BottomLayer "L3-No Net" (solid, remove dead copper, pour order 58): 1237.95,3188.51 1237.95,3129.46 1202.15,3129.46 1178.9,3106.2 1178.9,3031.03 1178.9,1849.93 1218.27,1810.56 1218.27,1771.19 1218.27,1746.54 1213.3,1751.5 1100.16,1751.5 1100.16,3109.77 1139.53,3149.14 1190.26,3199.87 1231.45,3199.87
STRIP1 on BottomLayer "esd1" (solid, remove dead copper, pour order 30): -130.16,90 150.35,90 150.35,-116.61 1434.8,-116.61 1434.8,-175.66 -130.16,-175.66
STRIP3 on BottomLayer "STRIP3_L04_P028" (solid, remove dead copper, pour order 28): 8424.3,-177.63 8424.97,-177.63 8473.79,-128.81 4584.41,-128.81 4584.41,-177.63
STRIP2 on BottomLayer "esd1" (solid, remove dead copper, pour order 26): 3125.09,-177.63 3797.01,-177.63 3797.01,-127.66 1631.65,-127.66 1631.65,-177.63
P3V3 on BottomLayer "L3-No Net" (solid, remove dead copper, pour order 38): 5371.81,1869.61 5568.66,1869.61 5568.66,1683.38 5579.27,1672.76 5714.27,1672.76 5714.27,609.77 5253.7,609.77 5253.7,727.88 5293.07,767.25 5293.07,1869.61 5371.81,1869.61
N12V0A on BottomLayer "L3-No Net" (solid, remove dead copper, pour order 49): 4702.3,1767.25 4702.3,1668.83 4525.13,1491.66 4525.13,1393.24 4525.13,1078.86 4466.08,1019.81 4390.22,943.95 4229.85,943.95 3904.93,943.95 3866.02,905.05 3466.08,905.05 3442.45,881.43 3442.45,802.68 3442.45,257.62 3402.44,217.61 3141.06,-43.77 2989.7,-43.77 2497.57,-43.77 2320.41,-43.77 1968.85,-43.77 1968.85,196.04 2025.13,252.32 2035.1,262.28 2359.78,262.28 2373.36,262.28 2373.36,3231.82 2564.5,3231.82 2533.39,3200.7 2533.39,2968.04 2533.39,117.26 2536.94,113.71 2538.98,115.74 2930.64,115.74 3115.82,115.74 3153.16,153.08 3344.03,343.95 3344.03,428.67 3344.03,3408.98 3402.44,3408.98 3402.44,3244.27 3462.14,3184.57 3462.14,3066.46 3462.14,975.91 3847.15,975.91 3875.52,1004.29 3890.46,1019.22 4092.06,1019.22 4288.91,1019.22 4328.28,1058.59 4356.27,1086.58 4356.27,1157.02 4356.27,1519.65 4603.87,1767.25
NetC17_2 on BottomLayer "TopLayer-No Net" (solid, remove dead copper, pour order 61): 5369.2,2096.33 5337.36,2064.5 5248.78,2064.5 5047.99,2265.28 5047.99,2362.72 4990.91,2419.81 4830.47,2419.81 4779.29,2470.99 4779.29,2674.73 4806.85,2702.29 4868.86,2702.29 4885.59,2685.56 4885.59,2561.54 4938.74,2508.39 5363.06,2508.39 5369.2,2502.26
TEC1- on BottomLayer "TopLayer-No Net" (solid, remove dead copper, pour order 62): 5067.68,372.57 4804.88,372.57 4788.15,389.3 4788.15,568.43 4890.51,670.8 5067.68,670.8
no net on TopLayer "balancing" (solid, pour order 64): -100.51,3603.26 8488.19,3603.26 8488.19,-97.2 -100.51,-97.2
STRIP1 on TopLayer "esd1" (solid, remove dead copper, pour order 57): -130.16,49.73 150.35,49.73 150.35,-128.42 1434.8,-128.42 1434.8,-187.47 -130.16,-187.47
STRIP2 on TopLayer "esd1" (solid, remove dead copper, pour order 41): 3797.01,-197.31 3797.01,-132.96 1631.65,-132.96 1631.65,-197.31
STRIP3 on TopLayer "STRIP3_L01_P043" (solid, remove dead copper, pour order 43): 8405.28,-197.31 8473.79,-128.81 4584.41,-128.81 4584.41,-197.31
TEC1+ on TopLayer "TopLayer-No Net" (solid, remove dead copper, pour order 63): 5178.9,755.44 5178.9,212.13 4806.71,212.13 4806.71,617.96 5034.06,617.96 5034.06,749.18 5063.95,779.06 5155.28,779.06
N12V0A on TopLayer "TopLayer-No Net" (solid, remove dead copper, pour order 60): 3505.97,860.76 4224.47,860.76 4224.47,142.26 4221.92,144.81 3505.97,144.81
GND on Signal Layer 1 "GND_L3" (solid, remove dead copper, pour order 67): -139.71,3724.56 8487.5,3724.56 8487.5,-212.34 -139.6,-212.34 -139.71,-212.45
P3V3 on Signal Layer 1 "NetC18_2" (solid, remove dead copper, pour order 53): 7271.65,854.33 7381.89,744.09 7622.05,744.09 7688.65,810.69 7688.65,1094.82 7488.19,1295.28 7488.19,1531.5 7685.04,1728.35 7685.04,2094.49 7649.61,2129.92 7413.39,2129.92 7307.09,2023.62 7307.09,1011.81 7271.65,976.38
P3V3_MP_B on Signal Layer 1 "NetC18_2" (solid, remove dead copper, pour order 65): 6303.15,645.67 6303.15,602.36 6801.18,104.33 6979.33,104.33 7016.73,141.73 7016.73,400.59 6717.52,699.8 6357.28,699.8
GND on Internal Plane 2 (split plane): 8506.34,3625.18 8506.34,-122.17 8427.62,-200.88 6174.79,-200.88 6171.97,-198.57 6168.55,-196.74 6164.84,-195.62 6160.98,-195.24 6157.12,-195.62 6153.41,-196.74 6152.68,-197.13 6041.1,-197.13 6040.24,-197.22 -124.92,-197.22 -124.92,108.47 -125.3,112.39 -126.45,116.16 -128.31,119.64 -130.8,122.68 -225.08,216.95 -225.08,3298.64 -130.8,3392.91 -128.3,3395.96 -126.45,3399.43 -125.3,3403.2 -124.92,3407.12 -124.92,3696.05 -116.04,3704.93 4525.35,3704.93 4525.35,2105.83 4820.63,1810.56 5411.18,1810.56 5411.18,1849.93 4820.63,1849.93 4564.72,2105.83 4564.72,3704.93 6142.22,3704.93 8426.59,3704.93

## Keep-outs
TopLayer:
  lines w10: -138,3641 6151,3641
KeepOutLayer:
  drawing of 8333 lines, arcs and shapes, not listed

## Other copper
TopLayer:
  rectangle net P12V0_CPCIS: 6908.65,-35 6963.57,5.35
  rectangle net P3V3_MP_B: 6873.23,214.21 6928.15,263.78
  rectangle net P12V0: 5100.16,2531.03 5190.71,2621.58
  rectangle net NetC17_2: 4686.77,2454.95 4726.14,2517.94
  rectangle net GND: 1700,94.02 1720.04,129.68
  rectangle net N12V0A: 3721.48,355.49 4033.23,652.53
  rectangle net TEC1-: 4407.24,586.15 4860,668.83
  rectangle net TEC1+: 4407.24,502.06 4871.81,578.28
  rectangle net SENS1_2: 4114.65,294.81 4169.76,348.94
  rectangle net SENS1_1: 4034.76,229.85 4169.76,284.97
  rectangle net GND: 4762.9,1228.31 4815.4,1252.92
  rectangle net GND: 4840.32,1633.39 4879.68,1684.57
  rectangle net GND: 4525.35,1928.67 4556.85,1940.48
  rectangle net GND: 499.77,-20.15 529.29,18.23
  pour cut-out: 2636.57,3373 2636.57,140.26 2773.39,140.26 2773.39,3373
  region net P3V3: 5226.99,2008.15 5197.54,2008.15 5163.8,1974.41 5163.8,1948.6 5183.73,1928.67 5228.65,1928.67
  region net NetC16_2: 5158,2088 5174.01,2104.01 5178.6,2115.38 5188.34,2127.25 5207.04,2145.95 5226.99,2145.95 5226.99,2067.21 5226.88,2067.1 5157.8,2067.1
  pour cut-out: 4564.72,3720.01 4564.72,2105.83 4820.63,1849.93 5411.18,1849.93 5411.18,1810.56 4820.63,1810.56 4525.35,2105.83 4525.35,3720.01
  pour cut-out: 3655.27,137.33 3712.76,137.33 3712.76,123.16 3718.27,117.65 3655.27,117.65
  pour cut-out: 4013.54,137.33 4230.08,137.33 4230.08,231.82 4249.76,231.82 4249.76,97.96 4013.54,97.96
Signal Layer 1:
  rectangle net GND: 4760.89,1364.38 4792.25,1430.55
  rectangle net TEC1-: 4989.43,415.26 5030.19,621.98
  rectangle net TEC1-: 4842.39,590.09 5002.55,648.83
  rectangle net P12V0: 5107.23,2534.97 5190.86,2623.55
  rectangle net N12V0A: 3737.95,373.55 3993.86,629.46
  rectangle net GND: 4437.27,1259.38 4466.3,1279.06
  rectangle net GND: 1814.72,2873.55 1848.19,2890.12
  rectangle net GND: 2740.41,-20.15 2793.07,-0.46
  rectangle net GND: 3127.72,-20.15 3181.36,-0.46
  rectangle net GND: 3531.1,-20.15 3581.85,-0.46
  rectangle net GND: 3915.12,-18.92 3956.95,-0.46
  rectangle net GND: 4315.22,-20.15 4367.87,-0.46
  rectangle net GND: 2340.31,-20.15 2393.96,-0.46
  rectangle net GND: 1966.3,-18.92 2005.67,-0.46
  rectangle net GND: 1552.91,-18.92 1606.55,-0.46
  rectangle net GND: 480.57,-21.09 518.84,4.48
  rectangle net GND: 4504.91,853.1 4542.8,891
  rectangle net GND: 4415.22,856.48 4446.61,890.53
  rectangle net GND: 5529.29,1670.89 5595.56,1730.03
  pour cut-out: 4564.72,3720.01 4564.72,2105.83 4820.63,1849.93 5411.18,1849.93 5411.18,1810.56 4820.63,1810.56 4525.35,2105.83 4525.35,3720.01
BottomLayer:
  rectangle net NetC3_2: 4863.15,1479.58 4926.94,1571.86
  rectangle net SENS1_2: 4114.94,292.1 4171.02,338.12
  rectangle net N12V0A: 3324.57,373.55 3349.47,566.46
  rectangle net SENS1_1: 4114.94,227.88 4170.06,283
  rectangle net GND: 667.09,157.02 684.61,197.17
  rectangle net GND: 4514.4,862.59 4532.42,880.61
  pour cut-out: 5369.43,2499.17 5673.6,2195 5982.05,2195 5982.05,2605.98 5967.7,2620.33 5958.7,2611.33 5444.01,2611.33
  pour cut-out: 4092.28,806.62 4111.97,806.62 4111.97,860.76 4108.65,864.08 4092.28,864.08
  pour cut-out: 4564.72,3720.01 4564.72,2105.83 4820.63,1849.93 5411.18,1849.93 5411.18,1810.56 4820.63,1810.56 4525.35,2105.83 4525.35,3720.01
Internal Plane 2 (plane layer: these items are gaps in the copper):
  pour cut-out: 4564.72,3720.01 4564.72,2105.83 4820.63,1849.93 5411.18,1849.93 5411.18,1810.56 4820.63,1810.56 4525.35,2105.83 4525.35,3720.01
  lines w39.37: 6160.98,-215.02 6159.09,-216.91 6041.1,-216.91 6041.02,-217 ; 6041.02,-217 -141.98,-217 6041.02,-217

## Silkscreen, mask and mechanical layers (free items; w line width, h text height)
TopOverlay:
  drawing of 1240 lines, arcs and shapes, not listed
  text "Zotino DIOT v1.4.3" at 6195.87,3479.33 h80
  text "WUT ISE 2024" at 6200.79,3374.02 h40
  text "CH31" at 4304.88,3176.7 h40 r90
  text "CH30" at 3383.62,3153.08 h40 r90
  text "CH27" at 2411.18,2971.98 h40 r90
  text "CH29" at 4295.8,2887.89 h40 r90
  text "CH28" at 3387.56,2873.55 h40 r90
  text "CH24" at 2411.18,2700.32 h40 r90
  text "CH26" at 4300.94,2609.77 h40 r90
  text "CH25" at 3387.56,2597.96 h40 r90
  text "CH21" at 2411.18,2436.54 h40 r90
  text "CH23" at 4300.94,2334.18 h40 r90
  text "CH22" at 3387.56,2330.24 h40 r90
  text "DAC OUT 24-31" at 1000,2279.53 h40 r90
  text "DAC OUT 16-23" at 1059.06,2275.59 h40 r90
  text "EEM0" at 5998.23,2203 h40
  text "EEM1" at 6524.93,2200.1 h40
  text "CH18" at 2411.18,2154.89 h40 r90
  text "CH20" at 4304.88,2058.59 h40 r90
  text "CH19" at 3387.56,2046.78 h40 r90
  text "CH15" at 2415.12,1877.89 h40 r90
  text "RESETn" at 5281.35,1841.29 h40
  text "CH17" at 4295.8,1789.09 h40 r90
  text "CH16" at 3387.56,1779.06 h40 r90
  text "SDI" at 5234.43,1772.93 h40
  text "CH12" at 2415.12,1601.9 h40 r90
  text "SCKI" at 5204.17,1548.57 h40
  text "N12V0A" at 4462.36,1531.64 h40
  text "CH14" at 4297.01,1515.28 h40 r90
  text "CH13" at 3387.56,1499.54 h40 r90
  text "P12V0A" at 4577.55,1413.58 h40
  text "CH9" at 2411.18,1342.06 h40 r90
  text "GND" at 4974.43,1311.49 h40
  text "CH11" at 4300.94,1255.44 h40 r90
  text "CH10" at 3383.62,1227.88 h40 r90
  text "CSn" at 4979.43,1228.31 h40
  text "P3V3MP" at 7683.62,1169.19 h40
  text "SDO" at 4979.43,1149.14 h40
  text "CH6" at 2411.18,1070.4 h40 r90
  text "LDACn" at 4899.46,1050.72 h40
  text "CH8" at 4302.91,997.57 h40 r90
  text "CH7" at 3387.56,971.98 h40 r90
  text "CH4" at 2415.12,806.62 h40 r90
  text "CH5" at 3387.56,696.39 h40 r90
  text "DAC OUT 0-7" at 1003.94,669.29 h40 r90
  text "DAC OUT 8-15" at 1066.93,669.29 h40 r90
  text "CLRn" at 5325.59,654.48 h40
  text "TEC-" at 4320.63,641.27 h60 r90
  text "CH2" at 2411.18,529.81 h40 r90
  text "SCL" at 7929.13,503.94 h40
  text "SDA" at 8074.8,496.06 h40
  text "BUSY" at 5503.94,488.19 h40
  text "CS_EXT" at 4472.2,485.76 h40
  text "P3V3" at 5240.68,474.75 h40
  text "CH3" at 3387.56,424.73 h40 r90
  text "P3V3MP" at 5424.66,414.33 h40
  text "2W max" at 4872.8,317.45 h60 r90
  text "TEC+" at 4328.5,294.81 h60 r90
  text "SDA" at 5639.49,275.8 h40
  text "CH0" at 2411.18,247.57 h40 r90
  text "GND" at 5296.38,212.72 h40
  text "SCL" at 5644.49,197.43 h40
  text "CH1" at 3399.06,156.5 h40 r90
  text "REF" at 3570.04,49.34 h40
  text "TEC controller" at 4781,-121 h78.74 r90
BottomOverlay:
  drawing of 1237 lines, arcs and shapes, not listed
  text "Zotino DIOT v1.4.3" at 421.26,2420.28 h80 r90
  text "WUT ISE 2024" at 527.74,1908.98 h40 r90
TopSolder:
  rectangle: -116.02,-194.77 8497.98,-124.01
  rectangle: 3619.84,770.54 3816,797.13
  rectangle: 3973.48,727.88 4013.54,797.13
  rectangle: 4033.23,720.01 4111.97,743.63
  rectangle: 4084.67,623.14 4131.65,672.76
  rectangle: 4084.67,672.76 4160.83,720.01
  rectangle: 4041.26,741.22 4160.83,796.64
  rectangle: 4137.97,456.23 4158.58,629.46
  rectangle: 4084.29,294.58 4111.97,343.95
  rectangle: 4023.4,287.08 4111.97,296.77
  rectangle: 3993.17,206.57 4033.23,255.44
  rectangle: 3797.01,216.38 3959.35,261.5
  rectangle: 3737.95,206.57 3797.01,261.5
  rectangle: 3666.05,222.96 3767.48,279.3
  rectangle: 3589.33,293.87 3632.49,353.87
  rectangle: 3570.28,206.57 3702.52,314.5
  rectangle: 3570.28,340.09 3643.76,421.78
  rectangle: 3570,578.97 3632.49,617.65
  rectangle: 3570.28,649.14 3639.53,797.13
  rectangle: 3678.9,735.76 3861.34,786.94
  rectangle: 4111.97,426.1 4145.26,632.79
  rectangle: 4044.69,343.95 4111.97,649.14
  rectangle: 3619.84,248.51 4023.4,339.35
  rectangle: 3619.84,339.35 4052.91,738.59
BottomSolder:
  rectangle: -116.02,-194.77 8497.98,-124.01
  rectangle: 4856.06,2271.19 4946.61,2294.81
Mechanical1:
  drawing of 317 lines, arcs and shapes, not listed
  text "Layer" at 672.77,5899.9 h60
  text "Name" at 1082.68,5899.9 h60
  text "Material" at 2122.39,5899.9 h60
  text "Thickness" at 2982.16,5899.9 h60
  text "Constant" at 3631.99,5899.9 h60
  text "Board Layer Stack" at 4201.85,5899.9 h60
  text "TopOverlay" at 1082.68,5779.9 h60
  text "TopSolder" at 1082.68,5659.9 h60
  text "Solder Resist" at 2122.39,5659.9 h60
  text "0,40mil" at 2982.16,5659.9 h60
  text "3.5" at 3631.99,5659.9 h60
  text "1" at 672.77,5539.9 h60
  text "TopLayer" at 1082.68,5539.9 h60
  text "1,40mil" at 2982.16,5539.9 h60
  text "Dielectric1" at 1082.68,5419.9 h60
  text "FR-4" at 2122.39,5419.9 h60
  text "14,17mil" at 2982.16,5419.9 h60
  text "4.8" at 3631.99,5419.9 h60
  text "2" at 672.77,5299.9 h60
  text "Internal Plane 2" at 1082.68,5299.9 h60
  text "1,42mil" at 2982.16,5299.9 h60
  text "Dielectric 3" at 1082.68,5179.9 h60
  text "27,56mil" at 2982.16,5179.9 h60
  text "4.2" at 3631.99,5179.9 h60
  text "3" at 672.77,5059.9 h60
  text "Signal Layer 1" at 1082.68,5059.9 h60
  text "1,42mil" at 2982.16,5059.9 h60
  text "Dielectric 5" at 1082.68,4939.9 h60
  text "14,17mil" at 2982.16,4939.9 h60
  text "4.2" at 3631.99,4939.9 h60
  text "4" at 672.77,4819.9 h60
  text "BottomLayer" at 1082.68,4819.9 h60
  text "1,40mil" at 2982.16,4819.9 h60
  text "BottomSolder" at 1082.68,4699.9 h60
  text "Solder Resist" at 2122.39,4699.9 h60
  text "0,40mil" at 2982.16,4699.9 h60
  text "3.5" at 3631.99,4699.9 h60
  text "BottomOverlay" at 1082.68,4579.9 h60
Mechanical4:
  lines w20: -240.16,-817.41 -240.16,4277.56
  lines w39.37: 1484.51,-18.92 1484.51,3524.39 4437.27,3524.39 4437.27,-18.92 1484.51,-18.92 ; 4673.49,1949.58 6051.44,1949.58 6051.44,3524.39 4673.49,3524.39 4673.49,1949.58
Mechanical8:
  lines w7.87: 3471.86,501.85 3865.38,501.85 ; 3863.94,501.85 4247.45,501.85 ; 3865.38,-21.6 3865.38,501.85 ; 3865.38,963.69 3865.38,501.85

## Text inside footprints (layer, text, board x,y; h text height)
IC6: TopOverlay "23" at 5971.7,2741.61 h47.24 r180; TopOverlay "14" at 5069.11,2741.61 h47.24 r180; TopOverlay "11" at 5057.86,3184.13 h47.24 r180; TopOverlay "2" at 5950.67,3184.13 h47.24 r180
J1: TopOverlay "A1" at 368.07,347.96 h47.24 r270; TopOverlay "B1" at 543,242 h47.24 r270; Mechanical14 "A1" at 368.07,347.96 h47.24 r270; Mechanical14 "B1" at 629.88,314.5 h47.24 r270; Mechanical8 "PCB Edge" at -370.12,764.3 h47.24 r270
J2: TopOverlay "10" at 5155.79,442.96 h39.37 r270; Mechanical14 "10" at 5155.79,442.96 h39.37 r270
J3: TopOverlay "26" at 680.19,1527.53 h40 r90; Mechanical14 "26" at 680.19,1527.53 h40 r90
J4: TopOverlay "26" at 1143.29,1527.53 h40 r90; Mechanical14 "26" at 1143.29,1527.53 h40 r90
J5: TopOverlay "26" at 1143.29,3141.71 h40 r90; Mechanical14 "26" at 1143.29,3141.71 h40 r90
J6: TopOverlay "30" at 6755.79,600.59 h40 r270; Mechanical14 "30" at 6755.79,600.59 h40 r270
J7: TopOverlay "26" at 680.19,3141.71 h40 r90; Mechanical14 "26" at 680.19,3141.71 h40 r90
J8: TopOverlay "6" at 7654.83,340.09 h39.37 r90; TopOverlay "5" at 7654.83,261.35 h39.37 r90; TopOverlay "4" at 7654.83,182.61 h39.37 r90; TopOverlay "3" at 7654.83,103.87 h39.37 r90; TopOverlay "2" at 7654.83,25.13 h39.37 r90; TopOverlay "1" at 7654.83,-53.61 h39.37 r90; TopOverlay "L" at 7853.65,-126.45 h39.37 r90; TopOverlay "K" at 7908.77,-126.45 h39.37 r90; TopOverlay "J" at 7963.89,-126.45 h39.37 r90; TopOverlay "I" at 8019.01,-116.61 h39.37 r90; TopOverlay "H" at 8074.12,-126.45 h39.37 r90; TopOverlay "G" at 8129.24,-126.45 h39.37 r90; TopOverlay "F" at 8184.36,-126.45 h39.37 r90; TopOverlay "E" at 8239.48,-126.45 h39.37 r90; TopOverlay "D" at 8294.6,-126.45 h39.37 r90; TopOverlay "C" at 8349.71,-165.82 h39.37 r90; TopOverlay "B" at 8404.83,-165.82 h39.37 r90; TopOverlay "A" at 8459.95,-165.82 h39.37 r90; DrillDrawing "Diam. 0.5mm +/-0.05" at 8469.79,511.35 h39.37 r180; DrillDrawing "PRESS-FIT TECHNOLOGY" at 8469.79,452.29 h39.37 r180; Mechanical14 "6" at 7654.83,340.09 h39.37 r90; Mechanical14 "5" at 7654.83,261.35 h39.37 r90; Mechanical14 "4" at 7724.17,38.91 h39.37 r90; Mechanical14 "3" at 7654.83,103.87 h39.37 r90; Mechanical14 "2" at 7654.83,25.13 h39.37 r90; Mechanical14 "1" at 7654.83,-53.61 h39.37 r90; Mechanical14 "L" at 7853.65,-126.45 h39.37 r90; Mechanical14 "K" at 7908.77,-126.45 h39.37 r90; Mechanical14 "J" at 7963.89,-126.45 h39.37 r90; Mechanical14 "I" at 8019.01,-116.61 h39.37 r90; Mechanical14 "H" at 8074.12,-126.45 h39.37 r90; Mechanical14 "G" at 8129.24,-126.45 h39.37 r90; Mechanical14 "F" at 8184.36,-126.45 h39.37 r90; Mechanical14 "E" at 8239.48,-126.45 h39.37 r90; Mechanical14 "D" at 8294.6,-126.45 h39.37 r90; Mechanical14 "C" at 8349.71,-165.82 h39.37 r90; Mechanical14 "B" at 8404.83,-165.82 h39.37 r90; Mechanical14 "A" at 8459.95,-165.82 h39.37 r90; Mechanical8 "Edge of Daugher Card" at 8552.47,30.05 h19.68 r90; Mechanical8 "Top Surface of Mother Board" at 9005.23,-15.23 h19.68 r90
J9: TopOverlay "A" at 8459.96,2865.68 h39.37 r90; TopOverlay "B" at 8404.84,2865.68 h39.37 r90; TopOverlay "C" at 8349.72,2865.68 h39.37 r90; TopOverlay "D" at 8294.61,2905.05 h39.37 r90; TopOverlay "E" at 8239.49,2905.05 h39.37 r90; TopOverlay "F" at 8184.37,2905.05 h39.37 r90; TopOverlay "G" at 8129.25,2905.05 h39.37 r90; TopOverlay "H" at 8074.13,2905.05 h39.37 r90; TopOverlay "I" at 8019.02,2914.89 h39.37 r90; TopOverlay "J" at 7963.9,2905.05 h39.37 r90; TopOverlay "K" at 7908.78,2905.05 h39.37 r90; TopOverlay "L" at 7853.66,2905.05 h39.37 r90; TopOverlay "1" at 7654.84,2977.88 h39.37 r90; TopOverlay "2" at 7654.84,3056.62 h39.37 r90; TopOverlay "3" at 7654.84,3135.36 h39.37 r90; TopOverlay "4" at 7654.84,3214.1 h39.37 r90; TopOverlay "5" at 7654.84,3292.84 h39.37 r90; TopOverlay "6" at 7654.84,3371.58 h39.37 r90; TopOverlay "8" at 7654.84,3529.06 h39.37 r90; TopOverlay "7" at 7654.84,3450.32 h39.37 r90; DrillDrawing "PRESS-FIT TECHNOLOGY" at 8469.8,3641.27 h39.37 r180; DrillDrawing "Diam. 0.5mm +/-0.05" at 8469.8,3700.32 h39.37 r180; Mechanical14 "A" at 8459.96,2865.68 h39.37 r90; Mechanical14 "B" at 8404.84,2865.68 h39.37 r90; Mechanical14 "C" at 8349.72,2865.68 h39.37 r90; Mechanical14 "D" at 8294.61,2905.05 h39.37 r90; Mechanical14 "E" at 8239.49,2905.05 h39.37 r90; Mechanical14 "F" at 8184.37,2905.05 h39.37 r90; Mechanical14 "G" at 8129.25,2905.05 h39.37 r90; Mechanical14 "H" at 8074.13,2905.05 h39.37 r90; Mechanical14 "I" at 8019.02,2914.89 h39.37 r90; Mechanical14 "J" at 7963.9,2905.05 h39.37 r90; Mechanical14 "K" at 7908.78,2905.05 h39.37 r90; Mechanical14 "L" at 7853.66,2905.05 h39.37 r90; Mechanical14 "1" at 7654.84,2977.88 h39.37 r90; Mechanical14 "2" at 7654.84,3056.62 h39.37 r90; Mechanical14 "3" at 7654.84,3135.36 h39.37 r90; Mechanical14 "4" at 7654.84,3214.1 h39.37 r90; Mechanical14 "5" at 7654.84,3292.84 h39.37 r90; Mechanical14 "6" at 7654.84,3371.58 h39.37 r90; Mechanical14 "8" at 7654.84,3529.06 h39.37 r90; Mechanical14 "7" at 7654.84,3450.32 h39.37 r90; Mechanical8 "Top Surface of Mother Board" at 9005.24,3095.01 h19.68 r90; Mechanical8 "Edge of Daugher Card" at 8552.48,3140.29 h19.68 r90
J13: TopOverlay "A1" at 368.07,1135.36 h47.24 r270; TopOverlay "B1" at 541.1,979.85 h47.24; Mechanical14 "A1" at 368.07,1135.36 h47.24 r270; Mechanical14 "B1" at 629.88,1101.9 h47.24 r270; Mechanical8 "PCB Edge" at -370.12,1551.7 h47.24 r270
J14: TopOverlay "A1" at 368.07,2710.17 h47.24 r270; TopOverlay "B1" at 539,2562 h47.24; Mechanical14 "A1" at 368.07,2710.17 h47.24 r270; Mechanical14 "B1" at 629.88,2676.7 h47.24 r270; Mechanical8 "PCB Edge" at -370.12,3126.51 h47.24 r270
J15: TopOverlay "A1" at 368.07,1922.77 h47.24 r270; TopOverlay "B1" at 520.5,1772.5 h47.24; Mechanical14 "A1" at 368.07,1922.77 h47.24 r270; Mechanical14 "B1" at 629.88,1889.3 h47.24 r270; Mechanical8 "PCB Edge" at -370.12,2339.1 h47.24 r270
J37: TopOverlay "30" at 6043.23,604.89 h40 r270; Mechanical14 "30" at 6043.23,604.89 h40 r270